# Altium PCB IDC_Tester_v1.PcbDoc (part 4 of 5)
Units mm, origin at the board's own origin, x right, y up, seen from the top; angles counter-clockwise.
Board outline 140 x 140 mm, 2 copper layers (Top Layer, Bottom Layer); 594 components, 528 nets, 1855 pads, 179 vias.
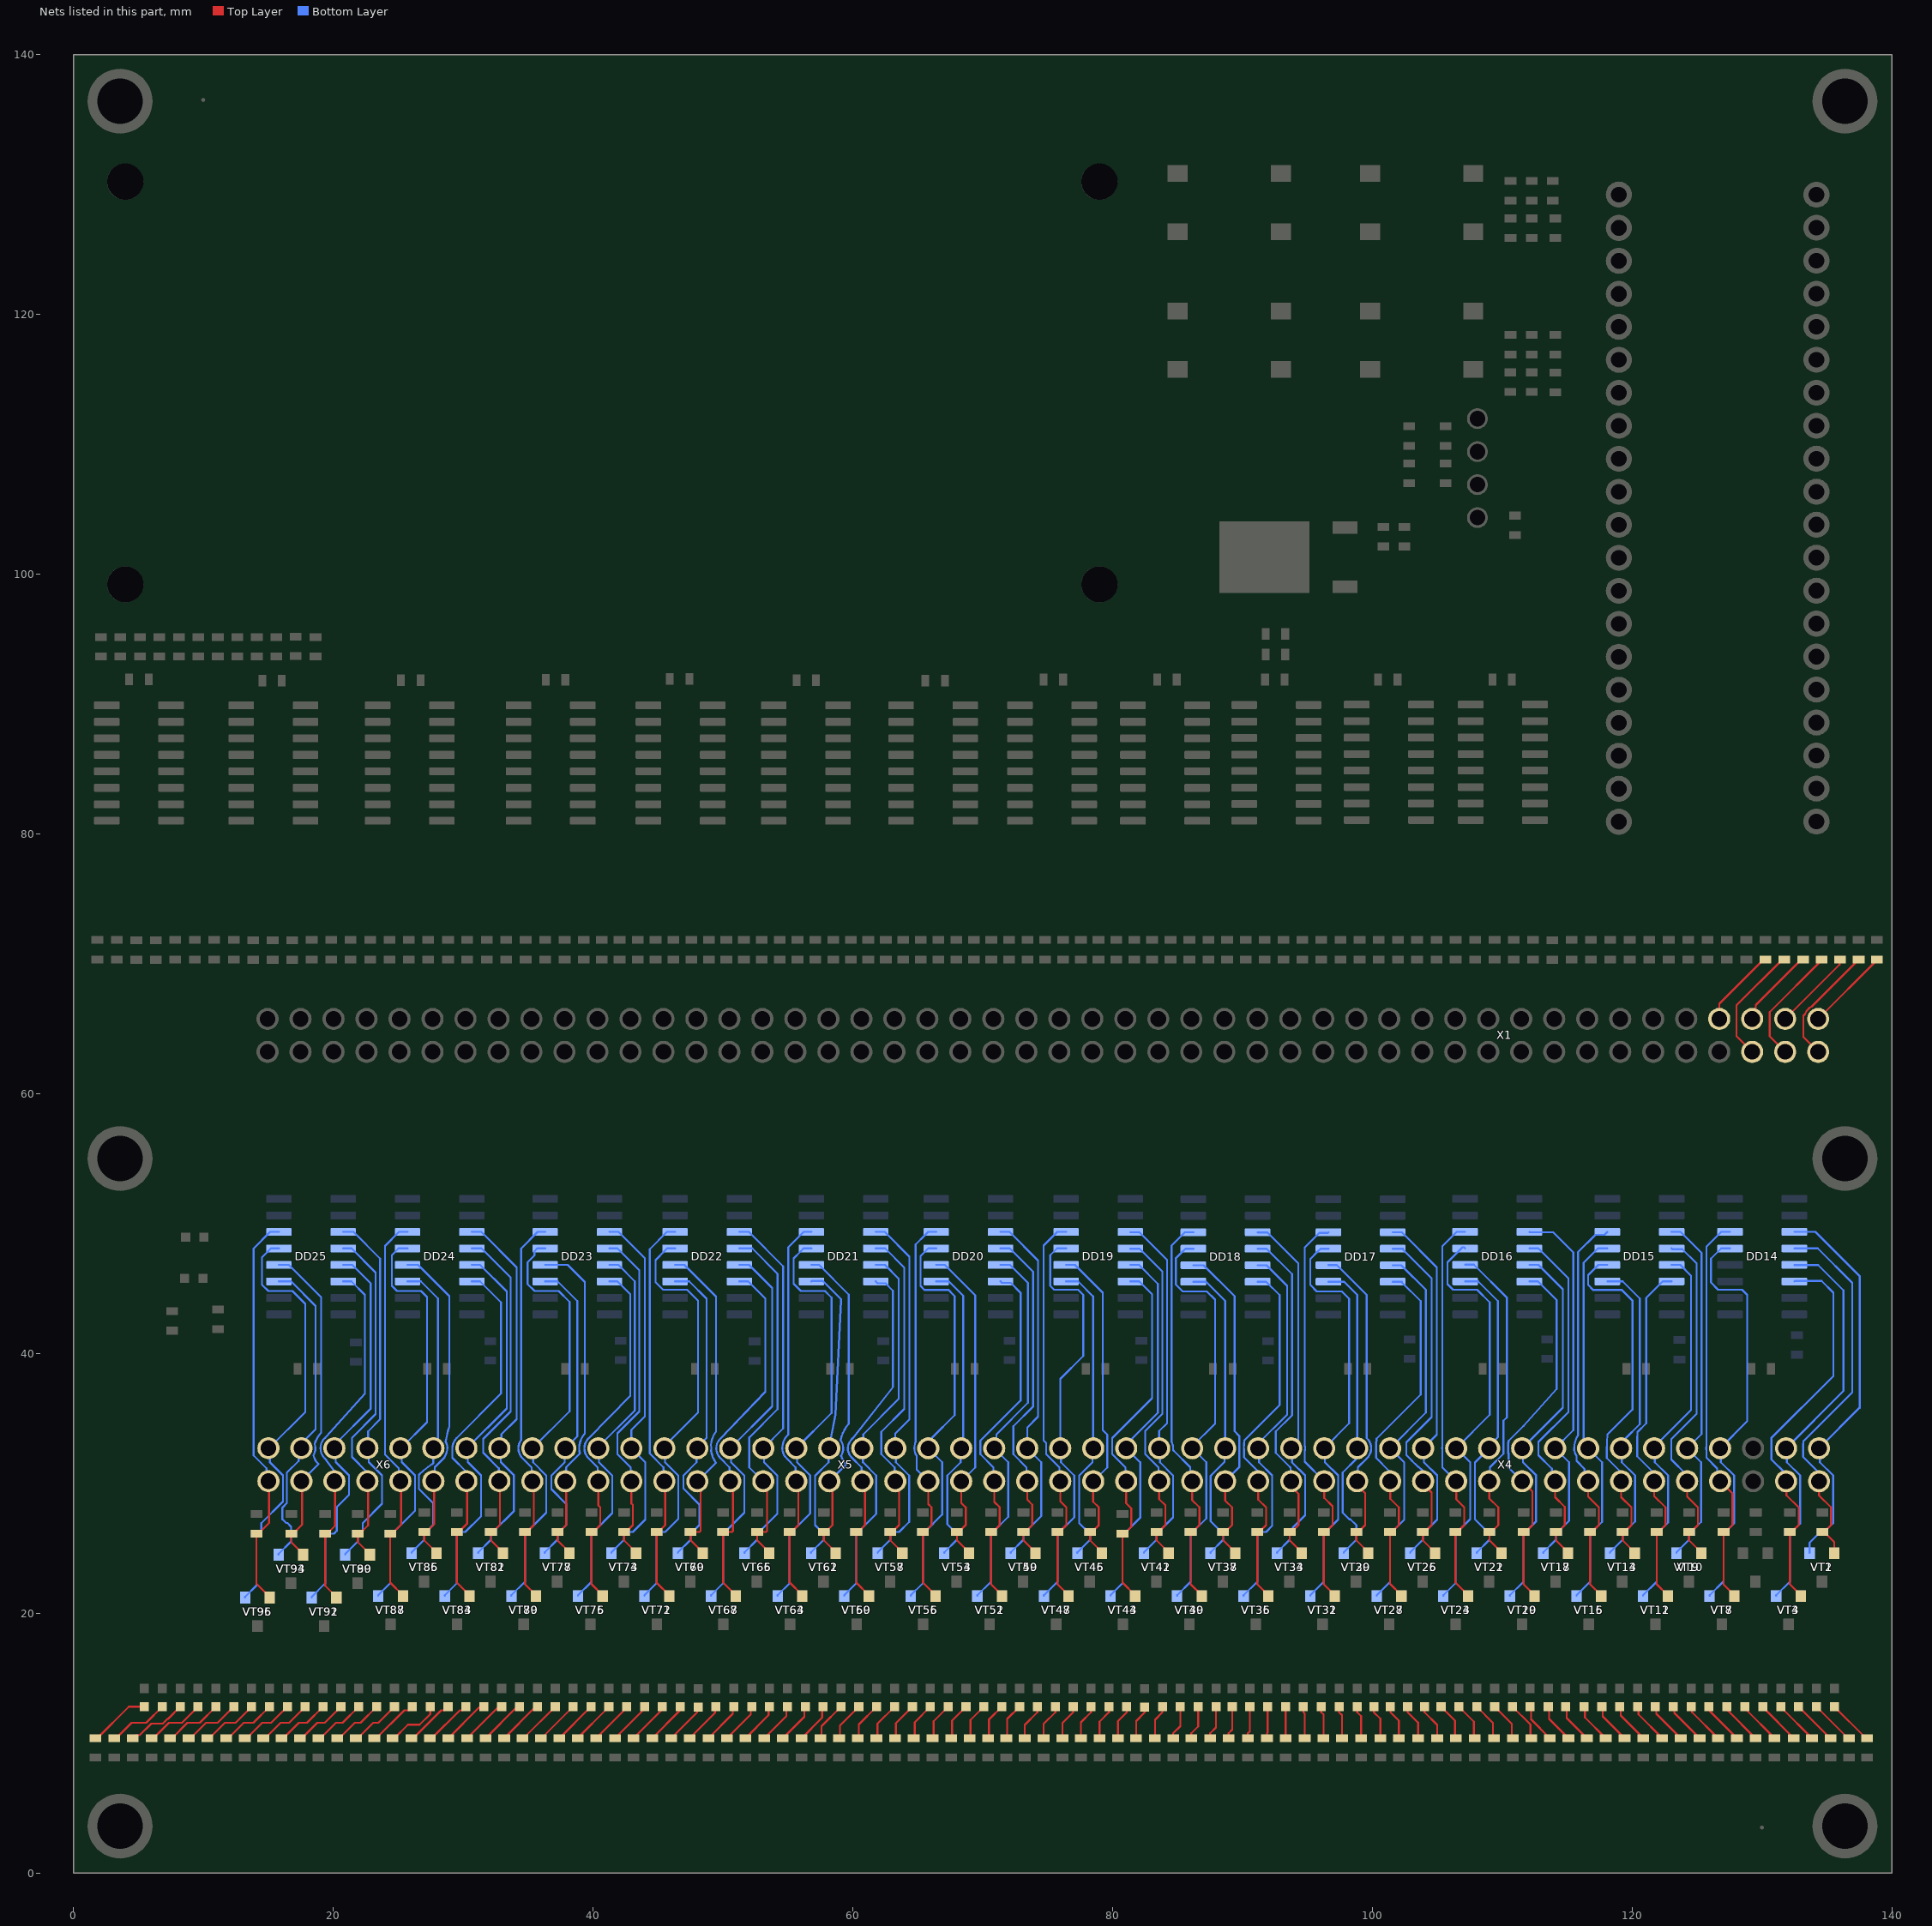
[diagram p3: the nets of this part, all layers, seen from the top]

## Via types
v1: diameter 0.6, hole 0.3, Top Layer to Bottom Layer, 179 vias

## Nets (pads, with @x,y where several pads share a name; then routed paths per layer and width w, separated by ;. In a path a pad name is that pad's centre, name@x,y a point inside that pad or via, vN(x,y) a via of type N, cw(c..) or ccw(c..) an arc to the next point about the centre after c; other vN are vias at no path point) (continued)
NetDD14_5: DD14.5 R14.1 VT7.1 X4.7 | length 32.2
  Bottom Layer w0.15: VT7.1@125.975,21.325 125.975,21.375 127.05,22.45 R14.1@127.05,26.25 127.2,26.25 127.86,26.91 127.86,30.6 126.84,31.62 126.84,32.64 126.785,32.695 128.875,34.785 128.875,44.504 128.474,44.905 126.626,44.905 126.075,45.456 126.075,47.29 126.865,48.08 DD14.5@127.55,48.08
NetDD14_6: DD14.6 R16.1 VT8.1 X4.8 | length 30.7
  Top Layer w0.15: X4.8@126.785,30.155 127.725,29.215 127.725,26.775 127.2,26.25 R16.1@127.05,26.25 127.05,22.2 127.875,21.375 VT8.1@127.875,21.325
  Bottom Layer w0.15: X4.8@126.785,30.155 126.558,30.382 126.558,31.142 125.725,31.975 125.725,32.494 cw(c126.781,32.695) 125.725,32.896 125.725,48.21 126.865,49.35 DD14.6@127.55,49.35
NetDD14_11: DD14.11 R2.1 VT1.1 X4.1 | length 30.4
  Bottom Layer w0.15: DD14.11@132.5,49.35 134.125,49.35 137.525,45.95 137.525,35.815 134.405,32.695 134.46,32.64 134.46,31.62 135.48,30.6 135.48,26.93 134.8,26.25 R2.1@134.65,26.25 134.5,26.25 133.675,25.425 VT1.1@133.675,24.625
NetDD14_12: DD14.12 R4.1 VT2.1 X4.2 | length 29.5
  Top Layer w0.15: X4.2@134.405,30.155 134.405,29.063 135.325,28.143 135.325,26.775 R4.1@134.8,26.25 ; R4.1@134.65,26.25 R4.1@134.8,26.25 ; VT2.1@135.575,24.625 135.575,25.475 R4.1@134.8,26.25
  Bottom Layer w0.15: DD14.12@132.5,48.08 134.295,48.08 136.95,45.425 136.95,37 133.238,33.288 133.199,33.249 ccw(c138.97,32.715) 133.175,32.625 133.175,32.025 133.219,31.981 134.35,30.85 134.35,30.21 X4.2@134.405,30.155
NetDD14_13: DD14.13 R6.1 VT3.1 X4.3 | length 31.2
  Bottom Layer w0.15: VT3.1@131.1,21.325 131.1,21.375 132.15,22.425 R6.1@132.15,26.25 132.3,26.25 132.94,26.89 132.94,30.6 131.92,31.62 131.92,32.64 131.865,32.695 136.275,37.105 136.275,44.85 134.325,46.8 132.51,46.8 DD14.13@132.5,46.81
NetDD14_14: DD14.14 R8.1 VT4.1 X4.4 | length 30.3
  Top Layer w0.15: X4.4@131.865,30.155 131.888,30.132 131.888,29.08 132.825,28.143 132.825,26.775 132.3,26.25 R8.1@132.15,26.25 132.15,22.225 133,21.375 VT4.1@133,21.325
  Bottom Layer w0.15: X4.4@131.865,30.155 131.81,30.21 131.81,30.765 130.725,31.85 130.725,33.475 135.5,38.25 135.5,44.675 134.6,45.575 132.535,45.575 DD14.14@132.5,45.54
NetDD15_3: DD15.3 R26.1 VT13.1 X4.13 | length 24.6
  Bottom Layer w0.15: DD15.3@118.1,45.54 119.285,45.54 120.6,44.225 120.6,34.55 119.462,33.412 119.462,32.992 119.165,32.695 119.22,32.64 119.22,31.62 120.24,30.6 120.24,27.065 119.425,26.25 R26.1@119.275,26.25 119.275,25.65 118.3,24.675 VT13.1@118.3,24.625
NetDD15_4: DD15.4 R28.1 VT14.1 X4.14 | length 28.2
  Top Layer w0.15: X4.14@119.165,30.155 119.165,28.928 119.95,28.143 119.95,26.775 119.425,26.25 R28.1@119.275,26.25 119.275,25.6 120.2,24.675 VT14.1@120.2,24.625
  Bottom Layer w0.15: DD15.4@118.1,46.81 117.415,46.81 116.625,46.02 116.625,45.275 117.025,44.875 119.225,44.875 120.03,44.07 120.03,35.68 118.108,33.758 ccw(c130.027,32.656) 118.057,32.577 118.057,31.943 119.11,30.89 119.11,30.21 X4.14@119.165,30.155
NetDD15_5: DD15.5 R30.1 VT15.1 X4.15 | length 29.4
  Bottom Layer w0.15: VT15.1@115.725,21.325 115.725,21.375 116.775,22.425 R30.1@116.775,26.25 116.925,26.25 117.7,27.025 117.7,31.62 116.625,32.695 116.275,33.045 116.275,46.975 117.38,48.08 DD15.5@118.1,48.08
NetDD15_6: DD15.6 R32.1 VT16.1 X4.16 | length 30.9
  Top Layer w0.15: X4.16@116.625,30.155 116.625,28.968 117.45,28.143 117.45,26.775 116.925,26.25 R32.1@116.775,26.25 116.775,22.225 117.625,21.375 VT16.1@117.625,21.325
  Bottom Layer w0.15: X4.16@116.625,30.155 116.348,30.432 116.348,31.102 115.725,31.725 115.725,32.101 cw(c116.621,32.695) 115.546,32.695 cw(c117.372,32.695) 115.85,33.704 115.85,47.8 117.175,49.125 117.875,49.125 DD15.6@118.1,49.35
NetDD15_11: DD15.11 R18.1 VT9.1 X4.9 | length 27.9
  Bottom Layer w0.15: DD15.11@123.05,49.35 123.735,49.35 125.35,47.735 125.35,33.8 124.245,32.695 125.32,31.62 125.32,27.02 124.55,26.25 R18.1@124.4,26.25 124.4,25.65 123.425,24.675 VT9.1@123.425,24.625
NetDD15_12: DD15.12 R20.1 VT10.1 X4.10 | length 27.1
  Top Layer w0.15: X4.10@124.245,30.155 124.245,28.973 125.075,28.143 125.075,26.775 124.55,26.25 R20.1@124.4,26.25 124.4,25.6 125.325,24.675 VT10.1@125.325,24.625
  Bottom Layer w0.15: DD15.12@123.05,48.08 123.105,48.025 123.875,48.025 124.975,46.925 124.975,35.35 123.025,33.4 123.025,31.825 124.19,30.66 124.19,30.21 X4.10@124.245,30.155
NetDD15_13: DD15.13 R22.1 VT11.1 X4.11 | length 29
  Bottom Layer w0.15: VT11.1@120.85,21.325 120.85,21.375 121.9,22.425 R22.1@121.9,26.25 122.05,26.25 122.78,26.98 122.78,30.6 121.76,31.62 121.76,32.64 121.705,32.695 121.705,32.804 124.55,35.649 124.55,45.975 123.715,46.81 DD15.13@123.05,46.81
NetDD15_14: DD15.14 R24.1 VT12.1 X4.12 | length 27.3
  Top Layer w0.15: X4.12@121.705,30.155 121.705,29.013 122.575,28.143 122.575,26.775 122.05,26.25 R24.1@121.9,26.25 121.9,22.225 122.75,21.375 VT12.1@122.75,21.325
  Bottom Layer w0.15: X4.12@121.705,30.155 121.65,30.21 121.65,30.825 120.4,32.075 120.4,32.69 ccw(c120.25,32.689) 120.4,32.703 cw(c121.471,32.788) 120.396,32.796 cw(c175.651,32.503) 120.414,33.94 121.1,34.626 121.1,44.275 122.365,45.54 DD15.14@123.05,45.54
NetDD16_3: DD16.3 R42.1 VT21.1 X4.21 | length 24.2
  Bottom Layer w0.15: DD16.3@107.15,45.54 108.16,45.54 109.675,44.025 109.675,33.545 109.005,32.875 109.005,32.695 107.9,31.59 107.9,27.225 108.875,26.25 R42.1@109.025,26.25 109.025,25.65 108.05,24.675 VT21.1@108.05,24.625
NetDD16_4: DD16.4 R44.1 VT22.1 X4.22 | length 25.5
  Top Layer w0.15: X4.22@109.005,30.155 109.005,28.838 109.7,28.143 109.7,26.775 109.175,26.25 R44.1@109.025,26.25 109.025,25.6 109.95,24.675 VT22.1@109.95,24.625
  Bottom Layer w0.15: DD16.4@107.15,46.81 107.165,46.825 107.825,46.825 110.375,44.275 110.375,35.084 110.1,34.809 110.1,32.27 109.06,31.23 109.06,30.21 X4.22@109.005,30.155
NetDD16_5: DD16.5 R46.1 VT23.1 X4.23 | length 32.4
  Bottom Layer w0.15: VT23.1@105.475,21.325 105.475,21.375 106.4,22.3 R46.1@106.4,26.25 106.55,26.25 107.54,27.24 107.54,31.62 106.465,32.695 109.05,35.28 109.05,43.929 108.074,44.905 106.226,44.905 105.8,45.331 105.8,47.019 106.943,48.163 107.067,48.163 DD16.5@107.15,48.08
NetDD16_6: DD16.6 R48.1 VT24.1 X4.24 | length 30.6
  Top Layer w0.15: X4.24@106.465,30.155 106.465,28.753 107.075,28.143 107.075,26.775 106.55,26.25 R48.1@106.4,26.25 106.4,22.35 107.375,21.375 VT24.1@107.375,21.325
  Bottom Layer w0.15: X4.24@106.465,30.155 105.4,31.22 105.4,32.522 cw(c106.461,32.695) 105.4,32.868 105.4,48.25 106.5,49.35 DD16.6@107.15,49.35
NetDD16_11: DD16.11 R34.1 VT17.1 X4.17 | length 29.1
  Bottom Layer w0.15: DD16.11@112.1,49.35 112.125,49.325 113.925,49.325 115.475,47.775 115.475,34.085 114.085,32.695 115.16,31.62 115.16,27.11 114.3,26.25 R34.1@114.15,26.25 114.15,25.65 113.175,24.675 VT17.1@113.175,24.625
NetDD16_12: DD16.12 R36.1 VT18.1 X4.18 | length 27.6
  Top Layer w0.15: X4.18@114.085,30.155 114.085,28.916 114.825,28.176 114.825,26.775 114.3,26.25 R36.1@114.15,26.25 114.15,25.6 115.075,24.675 VT18.1@115.075,24.625
  Bottom Layer w0.15: DD16.12@112.1,48.08 112.795,48.08 115.1,45.775 115.1,35.475 112.8,33.175 112.8,32.151 113.828,31.122 113.828,30.412 X4.18@114.085,30.155
NetDD16_13: DD16.13 R38.1 VT19.1 X4.19 | length 29.6
  Bottom Layer w0.15: VT19.1@110.6,21.325 110.6,21.375 111.65,22.425 R38.1@111.65,26.25 111.8,26.25 112.62,27.07 112.62,30.6 111.6,31.62 111.6,32.64 111.545,32.695 114.675,35.825 114.675,44.925 112.79,46.81 DD16.13@112.1,46.81
NetDD16_14: DD16.14 R40.1 VT20.1 X4.20 | length 28.5
  Top Layer w0.15: X4.20@111.545,30.155 112.325,29.375 112.325,26.775 111.8,26.25 R40.1@111.65,26.25 111.65,22.225 112.5,21.375 VT20.1@112.5,21.325
  Bottom Layer w0.15: X4.20@111.545,30.155 111.49,30.21 110.5,31.2 110.5,32.303 110.466,32.303 110.466,33.14 110.5,33.174 110.5,33.271 111.651,34.422 114.2,37.25 114.2,44.1 112.76,45.54 DD16.14@112.1,45.54
NetDD17_3: DD17.3 R58.1 VT29.1 X4.29 | length 23.9
  Bottom Layer w0.15: DD17.3@96.629,45.517 97.839,45.517 98.845,44.511 98.845,32.695 98.79,32.64 98.79,31.89 97.725,30.825 97.725,27.732 98.232,27.225 98.325,27.225 98.775,26.775 R58.1@98.775,26.25 98.775,25.65 97.8,24.675 VT29.1@97.8,24.625
NetDD17_4: DD17.4 R60.1 VT30.1 X4.30 | length 25.3
  Top Layer w0.15: X4.30@98.845,30.155 98.845,29.845 99.45,29.24 99.45,26.775 98.925,26.25 R60.1@98.775,26.25 98.775,25.6 99.7,24.675 VT30.1@99.7,24.625
  Bottom Layer w0.15: DD17.4@96.629,46.787 96.642,46.8 97.275,46.8 99.575,44.5 99.575,33.485 99.592,33.468 cw(c98.845,32.695) 99.585,31.915 ccw(c99.689,31.807) 99.575,31.905 99.565,31.894 98.9,31.23 98.9,30.21 X4.30@98.845,30.155
NetDD17_5: DD17.5 R62.1 VT31.1 X4.31 | length 32.3
  Bottom Layer w0.15: VT31.1@95.225,21.325 95.225,21.375 96.275,22.425 R62.1@96.275,26.25 96.425,26.25 97.38,27.205 97.38,30.6 96.36,31.62 96.36,32.64 96.305,32.695 98.225,34.615 98.225,44.21 97.663,44.772 95.728,44.772 95.225,45.275 95.225,46.942 95.225,47.263 95.794,47.832 96.019,48.057 DD17.5@96.629,48.057
NetDD17_6: DD17.6 R64.1 VT32.1 X4.32 | length 30.8
  Top Layer w0.15: X4.32@96.305,30.155 96.305,28.869 96.95,28.224 96.95,26.775 96.425,26.25 R64.1@96.275,26.25 96.275,22.225 97.125,21.375 VT32.1@97.125,21.325
  Bottom Layer w0.15: X4.32@96.305,30.155 94.8,31.66 94.8,32.419 ccw(c93.761,32.695) 94.8,32.971 94.8,48.15 95.932,49.282 96.584,49.282 DD17.6@96.629,49.327
NetDD17_11: DD17.11 R50.1 VT25.1 X4.25 | length 28.3
  Bottom Layer w0.15: DD17.11@101.579,49.327 102.273,49.327 104.975,46.625 104.975,33.745 103.925,32.695 103.98,32.64 103.98,31.62 105,30.6 105,27.2 104.05,26.25 R50.1@103.9,26.25 103.9,25.65 102.925,24.675 VT25.1@102.925,24.625
NetDD17_12: DD17.12 R52.1 VT26.1 X4.26 | length 27.5
  Top Layer w0.15: X4.26@103.925,30.155 103.925,29.935 104.575,29.285 104.575,26.775 104.05,26.25 R52.1@103.9,26.25 103.9,25.6 104.825,24.675 VT26.1@104.825,24.625
  Bottom Layer w0.15: DD17.12@101.579,48.057 101.586,48.05 102.375,48.05 102.375,47.975 104.575,45.775 104.575,35.1 102.625,33.15 102.625,32.175 103.025,31.775 ccw(c103.838,32.478) 103.08,31.716 ccw(c113.186,41.871) 103.818,31.031 cw(c103.72,30.918) 103.87,30.918 103.87,30.21 X4.26@103.925,30.155
NetDD17_13: DD17.13 R54.1 VT27.1 X4.27 | length 29.4
  Bottom Layer w0.15: VT27.1@100.35,21.325 100.35,21.375 101.375,22.4 R54.1@101.375,26.25 101.525,26.25 102.46,27.185 102.46,31.62 101.385,32.695 104.125,35.435 104.125,44.9 102.238,46.787 DD17.13@101.579,46.787
NetDD17_14: DD17.14 R56.1 VT28.1 X4.28 | length 28.4
  Top Layer w0.15: X4.28@101.385,30.155 101.385,28.808 102.05,28.143 102.05,26.775 101.525,26.25 R56.1@101.375,26.25 101.375,22.25 102.25,21.375 VT28.1@102.25,21.325
  Bottom Layer w0.15: X4.28@101.385,30.155 101.33,30.21 101.33,30.92 100.292,31.958 100.292,32.585 cw(c108.157,32.701) 100.325,33.425 103.725,36.825 103.725,44.025 102.3,45.45 102.3,45.517 DD17.14@101.579,45.517
NetDD18_3: DD18.3 R74.1 VT37.1 X4.37 | length 23.8
  Bottom Layer w0.15: DD18.3@86.229,45.517 87.208,45.517 88.681,44.044 X4.37@88.681,32.695 ; VT37.1@87.55,24.625 87.55,24.675 88.525,25.65 R74.1@88.525,26.25 88.375,26.25 87.55,27.075 87.55,30.485 87.55,30.54 cw(c93.884,25.065) 87.963,30.985 88.63,31.651 88.63,32.64 X4.37@88.685,32.695
NetDD18_4: DD18.4 R76.1 VT38.1 X4.38 | length 25.5
  Top Layer w0.15: X4.38@88.685,30.155 88.685,28.658 89.2,28.143 89.2,26.775 88.675,26.25 R76.1@88.525,26.25 88.525,25.6 89.45,24.675 VT38.1@89.45,24.625
  Bottom Layer w0.15: DD18.4@86.229,46.787 87.013,46.787 89.4,44.4 89.4,34.01 89.76,33.65 89.76,31.23 X4.38@88.685,30.155
NetDD18_5: DD18.5 R78.1 VT39.1 X4.39 | length 32.2
  Bottom Layer w0.15: VT39.1@84.975,21.325 84.975,21.375 86.025,22.425 R78.1@86.025,26.25 86.175,26.25 87.22,27.295 87.22,31.62 86.145,32.695 86.145,32.835 87.9,34.59 87.9,44.135 87.263,44.772 85.415,44.772 84.875,45.312 84.875,47.313 85.394,47.832 85.619,48.057 DD18.5@86.229,48.057
NetDD18_6: DD18.6 R80.1 VT40.1 X4.40 | length 30.7
  Top Layer w0.15: X4.40@86.145,30.155 86.145,28.698 86.7,28.143 86.7,26.775 86.175,26.25 R80.1@86.025,26.25 86.025,22.225 86.875,21.375 VT40.1@86.875,21.325
  Bottom Layer w0.15: X4.40@86.145,30.155 85.995,30.305 85.995,31.23 84.717,32.508 84.673,32.552 ccw(c84.259,32.605) 84.674,32.646 ccw(c83.6,32.69) 84.55,33.193 84.55,48.3 85.577,49.327 DD18.6@86.229,49.327
NetDD18_11: DD18.11 R66.1 VT33.1 X4.33 | length 28
  Bottom Layer w0.15: DD18.11@91.179,49.327 91.206,49.3 91.925,49.3 94.3,46.925 94.3,33.234 X4.33@93.761,32.695 ; VT33.1@92.675,24.625 92.675,24.675 93.65,25.65 R66.1@93.65,26.25 93.875,26.475 93.875,26.575 94.84,27.54 94.84,30.6 93.82,31.62 93.82,32.64 X4.33@93.765,32.695
NetDD18_12: DD18.12 R68.1 VT34.1 X4.34 | length 26.9
  Top Layer w0.15: X4.34@93.765,30.155 93.765,29.755 94.325,29.195 94.325,26.775 93.8,26.25 R68.1@93.65,26.25 93.65,25.6 94.575,24.675 VT34.1@94.575,24.625
  Bottom Layer w0.15: DD18.12@91.179,48.057 91.868,48.057 93.825,46.1 93.825,35.235 92.575,33.985 92.575,32.336 93.665,31.245 ; 93.666,31.245 93.71,31.201 93.71,30.21 X4.34@93.765,30.155
NetDD18_13: DD18.13 R70.1 VT35.1 X4.35 | length 29.5
  Bottom Layer w0.15: VT35.1@90.1,21.325 90.1,21.375 91.15,22.425 R70.1@91.15,26.25 91.825,26.25 92.3,26.725 92.3,30.6 91.28,31.62 91.28,32.64 91.225,32.695 91.225,33.059 93.45,35.284 93.45,45.2 91.863,46.787 DD18.13@91.179,46.787
NetDD18_14: DD18.14 R72.1 VT36.1 X4.36 | length 27.8
  Top Layer w0.15: X4.36@91.225,30.155 91.225,28.743 91.825,28.143 91.825,26.775 91.3,26.25 R72.1@91.15,26.25 91.15,22.225 92,21.375 VT36.1@92,21.325
  Bottom Layer w0.15: DD18.14@91.179,45.517 91.833,45.517 92.865,44.485 92.865,36.015 90.189,33.339 90.15,33.3 ccw(c96.804,32.685) 90.122,32.721 ccw(c91.197,32.717) 90.125,32.631 cw(c89.976,32.618) 90.126,32.619 90.126,31.999 91.17,30.955 91.17,30.21 X4.36@91.225,30.155
NetDD19_3: DD19.3 R90.1 VT45.1 X5.5 | length 23.6
  Bottom Layer w0.15: DD19.3@76.429,45.54 77.36,45.54 78.52,44.38 X5.5@78.52,32.69 78.465,32.635 78.465,31.615 77.445,30.595 77.445,26.93 78.125,26.25 R90.1@78.275,26.25 78.275,25.65 77.3,24.675 VT45.1@77.3,24.625
NetDD19_4: DD19.4 R92.1 VT46.1 X5.6 | length 25.3
  Top Layer w0.15: X5.6@78.52,30.15 78.52,28.573 78.95,28.143 78.95,26.775 78.425,26.25 R92.1@78.275,26.25 78.275,25.6 79.2,24.675 VT46.1@79.2,24.625
  Bottom Layer w0.15: DD19.4@76.429,46.81 77.115,46.81 79.25,44.675 79.25,34.095 79.595,33.75 79.595,31.225 X5.6@78.52,30.15
NetDD19_5: DD19.5 R94.1 VT47.1 X5.7 | length 32
  Bottom Layer w0.15: VT47.1@74.725,21.325 74.725,21.375 75.775,22.425 R94.1@75.775,26.25 75.925,26.25 77.055,27.38 77.055,30.595 76.035,31.615 76.035,32.635 X5.7@75.98,32.69 75.98,38.035 77.75,39.805 77.75,44.508 77.353,44.905 75.505,44.905 75.219,45.191 75.219,47.555 75.744,48.08 DD19.5@76.429,48.08
NetDD19_6: DD19.6 R96.1 VT48.1 X5.8 | length 30.6
  Top Layer w0.15: X5.8@75.98,30.15 75.98,28.613 76.45,28.143 76.45,26.775 75.925,26.25 R96.1@75.775,26.25 75.775,22.225 76.625,21.375 VT48.1@76.625,21.325
  Bottom Layer w0.15: X5.8@75.98,30.15 75.925,30.205 75.925,31.225 74.904,32.246 74.904,33.096 74.7,33.3 74.7,48.3 75.75,49.35 DD19.6@76.429,49.35
NetDD19_11: DD19.11 R82.1 VT41.1 X5.1 | length 28
  Bottom Layer w0.15: DD19.11@81.379,49.327 82.073,49.327 84.2,47.2 84.2,34.625 83.6,34.025 X5.1@83.6,32.69 83.655,32.635 83.655,31.615 84.675,30.595 84.675,27.375 83.55,26.25 R82.1@83.4,26.25 83.4,25.65 82.425,24.675 VT41.1@82.425,24.625
NetDD19_12: DD19.12 R84.1 VT42.1 X5.2 | length 26.8
  Top Layer w0.15: X5.2@83.6,30.15 83.6,28.781 84.075,28.306 84.075,26.775 83.55,26.25 R84.1@83.4,26.25 83.4,25.6 84.325,24.675 VT42.1@84.325,24.625
  Bottom Layer w0.15: DD19.12@81.379,48.057 82.093,48.057 83.85,46.3 83.85,35.35 82.525,34.025 82.525,32.245 83.545,31.225 83.545,30.205 X5.2@83.6,30.15
NetDD19_13: DD19.13 R86.1 VT43.1 X5.3 | length 29.2
  Bottom Layer w0.15: VT43.1@79.85,21.325 79.85,21.375 80.775,22.3 R86.1@80.775,26.125 80.925,26.125 82.135,27.335 82.135,31.615 X5.3@81.06,32.69 81.06,32.984 83.5,35.424 83.5,45.35 82.04,46.81 DD19.13@81.379,46.81
NetDD19_14: DD19.14 R88.1 VT44.1 X5.4 | length 28
  Top Layer w0.15: X5.4@81.06,30.15 81.06,28.46 81.45,28.07 81.45,26.65 80.925,26.125 R88.1@80.775,26.125 80.775,22.35 81.75,21.375 VT44.1@81.75,21.325
  Bottom Layer w0.15: X5.4@81.06,30.15 81.005,30.205 81.005,31.225 79.985,32.245 79.985,33.485 83.05,36.55 83.05,44.55 82.06,45.54 DD19.14@81.379,45.54
NetDD20_3: DD20.3 R106.1 VT53.1 X5.13 | length 23.7
  Bottom Layer w0.15: DD20.3@66.429,45.54 67.41,45.54 68.513,44.437 68.513,32.843 X5.13@68.36,32.69 68.305,32.635 68.305,31.615 67.285,30.595 67.285,26.84 67.875,26.25 R106.1@68.025,26.25 68.025,25.65 67.05,24.675 VT53.1@67.05,24.625
NetDD20_4: DD20.4 R108.1 VT54.1 X5.14 | length 25.2
  Top Layer w0.15: X5.14@68.36,30.15 68.36,28.483 68.7,28.143 68.7,26.775 68.175,26.25 R108.1@68.025,26.25 68.025,25.6 68.95,24.675 VT54.1@68.95,24.625
  Bottom Layer w0.15: DD20.4@66.429,46.81 67.09,46.81 69.435,44.465 69.435,31.225 X5.14@68.36,30.15
NetDD20_5: DD20.5 R110.1 VT55.1 X5.15 | length 32.2
  Bottom Layer w0.15: VT55.1@64.475,21.325 64.475,21.375 65.4,22.3 R110.1@65.4,26.25 65.55,26.25 66.895,27.595 66.895,31.615 X5.15@65.82,32.69 66.117,32.987 66.117,33.517 67.85,35.25 67.85,44.408 67.639,44.619 67.463,44.795 67.383,44.875 67.275,44.875 65.535,44.875 65.219,45.191 65.219,45.889 65.225,45.895 65.225,46.455 65.219,46.461 65.219,47.159 65.225,47.165 65.225,47.486 65.594,47.855 65.819,48.08 DD20.5@66.429,48.08
NetDD20_6: DD20.6 R112.1 VT56.1 X5.16 | length 30.3
  Top Layer w0.15: X5.16@65.82,30.15 65.82,28.398 66.075,28.143 66.075,26.775 65.55,26.25 R112.1@65.4,26.25 65.4,22.35 66.375,21.375 VT56.1@66.375,21.325
  Bottom Layer w0.15: X5.16@65.82,30.15 64.925,31.045 64.925,32.095 cw(c65.82,32.69) 64.745,32.69 cw(c66.156,32.69) 64.85,33.224 64.85,48.381 65.594,49.125 65.819,49.35 DD20.6@66.429,49.35
NetDD20_11: DD20.11 R98.1 VT49.1 X5.9 | length 28.2
  Bottom Layer w0.15: DD20.11@71.379,49.35 72.075,49.35 74.275,47.15 74.275,35.125 73.44,34.29 X5.9@73.44,32.69 74.515,31.615 74.515,27.465 73.3,26.25 R98.1@73.15,26.25 73.15,25.65 72.175,24.675 VT49.1@72.175,24.625
NetDD20_12: DD20.12 R100.1 VT50.1 X5.10 | length 26.9
  Top Layer w0.15: X5.10@73.44,30.15 73.44,28.736 73.825,28.351 73.825,26.775 73.3,26.25 R100.1@73.15,26.25 73.15,25.6 74.075,24.675 VT50.1@74.075,24.625
  Bottom Layer w0.15: DD20.12@71.379,48.08 72.095,48.08 73.9,46.275 73.9,35.925 72.365,34.39 72.365,32.245 73.385,31.225 73.385,30.205 X5.10@73.44,30.15
NetDD20_13: DD20.13 R102.1 VT51.1 X5.11 | length 29.4
  Bottom Layer w0.15: VT51.1@69.6,21.325 69.6,21.375 70.65,22.425 R102.1@70.65,26.25 70.8,26.25 71.975,27.425 71.975,31.615 X5.11@70.9,32.69 71.065,32.855 71.065,33.765 73.5,36.2 73.5,45.425 72.115,46.81 DD20.13@71.379,46.81
NetDD20_14: DD20.14 R104.1 VT52.1 X5.12 | length 27.9
  Top Layer w0.15: X5.12@70.9,30.15 70.9,28.568 71.325,28.143 71.325,26.775 70.8,26.25 R104.1@70.65,26.25 70.65,22.225 71.5,21.375 VT52.1@71.5,21.325
  Bottom Layer w0.15: X5.12@70.9,30.15 70.845,30.205 70.845,31.225 69.825,32.245 69.825,33.275 72.925,36.375 72.925,44.675 72.177,45.423 71.496,45.423 DD20.14@71.379,45.54
NetDD21_3: DD21.3 R122.1 VT61.1 X5.21 | length 23.7
  Bottom Layer w0.15: VT61.1@56.8,24.625 56.8,24.675 57.775,25.65 R122.1@57.775,26.25 57.625,26.25 57.1,26.775 57.1,30.57 58.145,31.615 58.145,32.635 X5.21@58.2,32.69 58.2,32.748 58.2,32.81 58.675,35.281 59.1,44.051 59.1,44.175 57.7,45.575 56.864,45.575 DD21.3@56.829,45.54
NetDD21_4: DD21.4 R124.1 VT62.1 X5.22 | length 25.5
  Top Layer w0.15: X5.22@58.2,30.15 58.45,29.9 58.45,26.775 57.925,26.25 R124.1@57.775,26.25 57.775,25.6 58.7,24.675 VT62.1@58.7,24.625
  Bottom Layer w0.15: DD21.4@56.829,46.81 57.415,46.81 59.7,44.525 59.7,34.592 ccw(c61.848,32.734) 59.07,33.322 cw(c58.2,32.69) 59.108,32.114 ccw(c60.986,32.734) 59.49,31.44 X5.22@58.2,30.15
NetDD21_5: DD21.5 R126.1 VT63.1 X5.23 | length 32.7
  Bottom Layer w0.15: VT63.1@54.225,21.325 54.225,21.375 55.15,22.3 R126.1@55.15,26.25 55.3,26.25 56.735,27.685 56.735,30.595 55.715,31.615 55.715,32.635 X5.23@55.66,32.69 58.375,35.405 58.375,44.283 58.039,44.619 57.863,44.795 56.015,44.795 55.45,45.36 55.45,47.311 55.994,47.855 56.219,48.08 DD21.5@56.829,48.08
NetDD21_6: DD21.6 R128.1 VT64.1 X5.24 | length 30.5
  Top Layer w0.15: X5.24@55.66,30.15 55.825,29.985 55.825,26.775 55.3,26.25 R128.1@55.15,26.25 55.15,22.35 56.125,21.375 VT64.1@56.125,21.325
  Bottom Layer w0.15: X5.24@55.66,30.15 55.605,30.205 55.605,31.225 54.925,31.905 cw(c55.66,32.69) 54.585,32.69 cw(c56.055,32.69) 55.05,33.763 55.05,48.175 56.225,49.35 DD21.6@56.829,49.35
NetDD21_11: DD21.11 R114.1 VT57.1 X5.17 | length 28.5
  Bottom Layer w0.15: DD21.11@61.779,49.35 62.475,49.35 64.375,47.45 64.375,34.92 63.28,33.825 X5.17@63.28,32.69 63.335,32.635 63.335,31.615 64.355,30.595 64.355,27.03 63.575,26.25 R114.1@62.9,26.25 62.9,25.65 61.925,24.675 VT57.1@61.925,24.625
NetDD21_12: DD21.12 R116.1 VT58.1 X5.18 | length 26.8
  Top Layer w0.15: X5.18@63.28,30.15 63.575,29.855 63.575,26.775 63.05,26.25 R116.1@62.9,26.25 62.9,25.6 63.825,24.675 VT58.1@63.825,24.625
  Bottom Layer w0.15: DD21.12@61.779,48.08 62.495,48.08 63.975,46.6 63.975,35.72 62.205,33.95 62.205,32.245 63.225,31.225 63.225,30.205 X5.18@63.28,30.15
NetDD21_13: DD21.13 R118.1 VT59.1 X5.19 | length 29.4
  Bottom Layer w0.15: VT59.1@59.35,21.325 59.35,21.375 60.275,22.3 R118.1@60.275,26.25 60.425,26.25 61.815,27.64 61.815,30.595 60.795,31.615 60.795,32.635 X5.19@60.74,32.69 60.82,32.77 60.82,33.765 63.55,36.495 63.55,45.75 62.49,46.81 DD21.13@61.779,46.81
NetDD21_14: DD21.14 R120.1 VT60.1 X5.20 | length 27.6
  Top Layer w0.15: X5.20@60.74,30.15 60.95,29.94 60.95,26.775 60.425,26.25 R120.1@60.275,26.25 60.275,22.35 61.25,21.375 VT60.1@61.25,21.325
  Bottom Layer w0.15: X5.20@60.74,30.15 60.685,30.205 60.685,31.225 59.916,31.994 cw(c60.603,32.681) 59.861,33.308 cw(c60.74,32.69) 60,33.47 63.1,37.4 63.1,44.825 62.534,45.391 61.928,45.391 DD21.14@61.779,45.54
NetDD22_3: DD22.3 R138.1 VT69.1 X5.29 | length 24.6
  Bottom Layer w0.15: DD22.3@46.329,45.54 47.41,45.54 48.75,44.2 48.75,33.5 48.04,32.79 X5.29@48.04,32.69 47.985,32.635 47.985,31.615 46.965,30.595 46.965,29.594 48.2,28.359 48.2,26.775 47.675,26.25 R138.1@47.525,26.25 47.525,25.65 46.55,24.675 VT69.1@46.55,24.625
NetDD22_4: DD22.4 R140.1 VT70.1 X5.30 | length 25.9
  Top Layer w0.15: X5.30@48.04,30.15 48.288,29.902 48.288,26.338 48.2,26.25 R140.1@47.525,26.25 47.525,25.6 48.45,24.675 VT70.1@48.45,24.625
  Bottom Layer w0.15: DD22.4@46.329,46.81 47.04,46.81 49.475,44.375 49.475,33.974 ccw(c51.088,32.779) 49.087,32.934 cw(c48.04,32.69) 49.099,32.507 ccw(c51.088,32.779) 49.475,31.585 X5.30@48.04,30.15
NetDD22_5: DD22.5 R142.1 VT71.1 X5.31 | length 33.2
  Bottom Layer w0.15: VT71.1@43.975,21.325 43.975,21.375 44.9,22.3 R142.1@44.9,26.25 45.575,26.25 46.575,27.25 46.575,30.595 45.555,31.615 45.555,32.635 X5.31@45.5,32.69 45.5,32.85 48.1,35.45 48.1,44.058 47.253,44.905 45.405,44.905 44.825,45.485 44.825,47.186 45.494,47.855 45.719,48.08 DD22.5@46.329,48.08
NetDD22_6: DD22.6 R144.1 VT72.1 X5.32 | length 30.5
  Top Layer w0.15: X5.32@45.5,30.15 45.575,30.075 45.575,26.775 45.05,26.25 R144.1@44.9,26.25 44.9,22.35 45.875,21.375 VT72.1@45.875,21.325
  Bottom Layer w0.15: X5.32@45.5,30.15 45.445,30.205 45.445,31.225 44.375,32.295 44.375,48.025 45.7,49.35 DD22.6@46.329,49.35
NetDD22_11: DD22.11 R130.1 VT65.1 X5.25 | length 28.8
  Bottom Layer w0.15: DD22.11@51.279,49.35 52,49.35 54.65,46.7 54.65,34.22 X5.25@53.12,32.69 53.175,32.635 53.175,31.615 54.195,30.595 54.195,27.645 52.8,26.25 R130.1@52.65,26.25 52.65,25.65 51.675,24.675 VT65.1@51.675,24.625
NetDD22_12: DD22.12 R132.1 VT66.1 X5.26 | length 27.8
  Top Layer w0.15: X5.26@53.12,30.15 53.413,29.857 53.413,26.338 53.325,26.25 R132.1@52.65,26.25 52.65,25.6 53.575,24.675 VT66.1@53.575,24.625
  Bottom Layer w0.15: DD22.12@51.279,48.08 52.27,48.08 54.225,46.125 54.225,35.7 52.045,33.52 52.045,31.225 X5.26@53.12,30.15
NetDD22_13: DD22.13 R134.1 VT67.1 X5.27 | length 29.9
  Bottom Layer w0.15: VT67.1@49.1,21.325 49.1,21.375 50.025,22.3 R134.1@50.025,26.25 50.175,26.25 51.655,27.73 51.655,30.595 50.635,31.615 50.635,32.635 X5.27@50.58,32.69 50.58,32.705 53.8,35.925 53.8,45.025 52.015,46.81 DD22.13@51.279,46.81
NetDD22_14: DD22.14 R136.1 VT68.1 X5.28 | length 28.5
  Top Layer w0.15: X5.28@50.58,30.15 50.788,29.942 50.788,26.338 50.7,26.25 R136.1@50.025,26.25 50.025,22.35 51,21.375 VT68.1@51,21.325
  Bottom Layer w0.15: X5.28@50.58,30.15 50.525,30.205 50.525,31.225 49.82,31.93 cw(c50.58,32.69) 49.804,33.434 53.275,37.05 53.275,44.225 51.96,45.54 DD22.14@51.279,45.54
NetDD23_3: DD23.3 R154.1 VT77.1 X5.37 | length 24.6
  Bottom Layer w0.15: VT77.1@36.3,24.625 36.3,24.675 37.275,25.65 R154.1@37.275,26.25 37.425,26.25 37.95,26.775 37.95,28.404 36.805,29.549 36.805,30.595 37.825,31.615 37.825,32.635 X5.37@37.88,32.69 38.8,33.61 38.8,44.025 37.285,45.54 DD23.3@36.329,45.54
NetDD23_4: DD23.4 R156.1 VT78.1 X5.38 | length 25.8
  Top Layer w0.15: X5.38@37.88,30.15 37.95,30.08 37.95,26.775 37.425,26.25 R156.1@37.275,26.25 37.275,25.6 38.2,24.675 VT78.1@38.2,24.625
  Bottom Layer w0.15: DD23.4@36.329,46.81 38.065,46.81 39.375,45.5 39.375,33.834 ccw(c40.719,32.685) 39,33.1 ccw(c40.693,32.691) 38.953,32.761 cw(c37.88,32.69) 38.953,32.62 ccw(c40.693,32.691) 38.999,32.288 37.935,31.225 37.935,30.205 X5.38@37.88,30.15
NetDD23_5: DD23.5 R158.1 VT79.1 X5.39 | length 32.9
  Bottom Layer w0.15: VT79.1@33.725,21.325 33.725,21.375 34.775,22.425 R158.1@34.775,26.25 34.925,26.25 36.415,27.74 36.415,30.595 35.395,31.615 35.395,32.635 X5.39@35.34,32.69 38.2,35.55 38.2,43.958 37.363,44.795 35.515,44.795 34.975,45.335 34.975,47.015 35.494,47.534 35.494,47.855 35.719,48.08 DD23.5@36.329,48.08
NetDD23_6: DD23.6 R160.1 VT80.1 X5.40 | length 30.3
  Top Layer w0.15: X5.40@35.34,30.15 35.45,30.04 35.45,26.775 34.925,26.25 R160.1@34.775,26.25 34.775,22.225 35.625,21.375 VT80.1@35.625,21.325
  Bottom Layer w0.15: X5.40@35.34,30.15 35.285,30.205 35.285,31.225 34.475,32.035 34.475,32.052 cw(c35.34,32.69) 34.475,33.328 34.475,48.075 35.75,49.35 DD23.6@36.329,49.35
NetDD23_11: DD23.11 R146.1 VT73.1 X5.33 | length 28.6
  Bottom Layer w0.15: DD23.11@41.279,49.35 41.975,49.35 44,47.325 44,35.15 42.96,34.11 X5.33@42.96,32.69 44.035,31.615 44.035,27.21 43.075,26.25 R146.1@42.4,26.25 42.4,25.65 41.425,24.675 VT73.1@41.425,24.625
NetDD23_12: DD23.12 R148.1 VT74.1 X5.34 | length 26.7
  Top Layer w0.15: X5.34@42.96,30.15 42.96,28.453 43.075,28.338 43.075,26.775 42.55,26.25 R148.1@42.4,26.25 42.4,25.6 43.325,24.675 VT74.1@43.325,24.625
  Bottom Layer w0.15: DD23.12@41.279,48.08 41.895,48.08 43.575,46.4 43.575,35.525 41.885,33.835 41.885,32.245 42.905,31.225 42.905,30.205 X5.34@42.96,30.15
NetDD23_13: DD23.13 R150.1 VT75.1 X5.35 | length 29.5
  Bottom Layer w0.15: VT75.1@38.85,21.325 38.85,21.375 39.9,22.425 R150.1@39.9,26.25 40.05,26.25 41.495,27.695 41.495,30.595 40.475,31.615 40.475,32.635 X5.35@40.42,32.69 40.42,32.794 43.225,35.599 43.225,45.55 41.965,46.81 DD23.13@41.279,46.81
NetDD23_14: DD23.14 R152.1 VT76.1 X5.36 | length 27.8
  Top Layer w0.15: X5.36@40.42,30.15 40.42,28.298 40.575,28.143 40.575,26.775 40.05,26.25 R152.1@39.9,26.25 39.9,22.225 40.75,21.375 VT76.1@40.75,21.325
  Bottom Layer w0.15: X5.36@40.42,30.15 40.365,30.205 40.365,31.225 39.661,31.929 cw(c40.42,32.69) 39.653,33.443 42.875,36.725 42.875,44.55 41.885,45.54 DD23.14@41.279,45.54
NetDD24_3: DD24.3 R170.1 VT85.1 X6.5 | length 24.4
  Bottom Layer w0.15: DD24.3@25.729,45.54 26.76,45.54 28.075,44.225 28.075,33.563 28.067,33.554 28.067,32.997 27.77,32.7 27.715,32.645 27.715,31.549 27.656,31.49 ccw(c30.845,26.405) 26.65,30.697 ccw(c26.755,30.591) 26.605,30.592 26.605,29.574 27.7,28.479 27.7,26.775 27.175,26.25 R170.1@27.025,26.25 27.025,25.65 26.05,24.675 VT85.1@26.05,24.625
NetDD24_4: DD24.4 R172.1 VT86.1 X6.6 | length 25.2
  Top Layer w0.15: X6.6@27.77,30.16 27.77,26.845 27.175,26.25 R172.1@27.025,26.25 27.025,25.6 27.95,24.675 VT86.1@27.95,24.625
  Bottom Layer w0.15: DD24.4@25.729,46.81 26.54,46.81 28.95,44.4 28.95,34.385 ccw(c36.571,31.954) 28.67,33.203 cw(c27.72,32.7) 28.623,32.117 cw(c27.583,32.388) 28.583,31.992 27.825,31.235 27.825,30.215 X6.6@27.77,30.16
NetDD24_5: DD24.5 R174.1 VT87.1 X6.7 | length 32.4
  Bottom Layer w0.15: VT87.1@23.475,21.325 23.475,21.375 24.4,22.3 R174.1@24.4,26.125 24.55,26.125 26.305,27.88 26.305,30.605 25.285,31.625 25.285,32.645 25.23,32.7 27.225,34.695 27.225,44.333 26.763,44.795 24.915,44.795 24.519,45.191 24.519,47.555 25.044,48.08 DD24.5@25.729,48.08
NetDD24_6: DD24.6 R176.1 VT88.1 X6.8 | length 30.5
  Top Layer w0.15: X6.8@25.23,30.16 25.23,26.805 24.55,26.125 R176.1@24.4,26.125 24.4,22.35 25.375,21.375 VT88.1@25.375,21.325
  Bottom Layer w0.15: X6.8@25.23,30.16 25.053,30.337 25.053,31.147 24,32.2 24,48.275 25.075,49.35 DD24.6@25.729,49.35
NetDD24_11: DD24.11 R162.1 VT81.1 X6.1 | length 28.8
  Bottom Layer w0.15: DD24.11@30.679,49.35 31.4,49.35 34.125,46.625 34.125,34.935 32.965,33.775 32.965,32.815 32.85,32.7 32.905,32.645 32.905,31.625 33.925,30.605 33.925,27.875 32.3,26.25 R162.1@32.15,26.25 32.15,25.65 31.175,24.675 VT81.1@31.175,24.625
NetDD24_12: DD24.12 R164.1 VT82.1 X6.2 | length 27.3
  Top Layer w0.15: X6.2@32.85,30.16 32.85,26.8 32.3,26.25 R164.1@32.15,26.25 32.15,25.6 33.075,24.675 VT82.1@33.075,24.625
  Bottom Layer w0.15: DD24.12@30.679,48.08 31.42,48.08 33.665,45.835 33.665,35.525 31.55,33.41 31.55,32.35 32.753,31.147 32.753,30.257 X6.2@32.85,30.16
NetDD24_13: DD24.13 R166.1 VT83.1 X6.3 | length 30.2
  Bottom Layer w0.15: VT83.1@28.6,21.325 28.6,21.375 29.525,22.3 R166.1@29.525,26.25 30.175,26.25 31.385,27.46 31.385,30.605 30.365,31.625 30.365,32.645 30.31,32.7 33.365,35.755 33.365,44.76 31.315,46.81 DD24.13@30.679,46.81
NetDD24_14: DD24.14 R168.1 VT84.1 X6.4 | length 28.3
  Top Layer w0.15: X6.4@30.31,30.16 30.31,26.885 29.675,26.25 R168.1@29.525,26.25 29.525,22.35 30.5,21.375 VT84.1@30.5,21.325
  Bottom Layer w0.15: X6.4@30.31,30.16 30.255,30.215 30.255,30.895 29.185,31.965 29.185,32.7 cw(c30.26,32.7) 29.497,33.457 32.925,36.91 32.925,43.925 31.31,45.54 DD24.14@30.679,45.54
NetDD25_3: DD25.3 R186.1 VT93.1 X6.13 | length 24.5
  Bottom Layer w0.15: VT93.1@15.8,24.5 15.8,24.55 16.775,25.525 R186.1@16.775,26.125 16.775,26.65 16.484,26.941 16.391,26.941 16.1,27.232 16.1,28.133 16.445,28.478 16.445,30.82 17.338,31.713 17.338,32.428 17.61,32.7 17.61,33.119 18.65,34.159 18.65,43.65 16.76,45.54 DD25.3@15.829,45.54
NetDD25_4: DD25.4 R188.1 VT94.1 X6.14 | length 25.7
  Top Layer w0.15: X6.14@17.61,30.16 17.61,26.81 16.925,26.125 R188.1@16.775,26.125 16.775,25.475 17.7,24.55 VT94.1@17.7,24.5
  Bottom Layer w0.15: DD25.4@15.829,46.81 16.59,46.81 19.075,44.325 19.075,33.89 ccw(c20.846,32.307) 18.583,33.03 cw(c17.56,32.7) 18.598,32.42 cw(c17.56,32.7) 18.485,32.152 ccw(c19.822,32.472) 18.875,31.475 X6.14@17.56,30.16
NetDD25_5: DD25.5 R190.1 VT95.1 X6.15 | length 33.1
  Bottom Layer w0.15: VT95.1@13.225,21.2 13.225,21.25 14.1,22.125 R190.1@14.1,26.125 14.25,26.125 14.475,26.35 14.475,26.932 16.145,28.602 16.145,30.605 15.125,31.625 15.125,32.645 15.07,32.7 15.075,32.7 17.85,35.475 17.85,43.808 16.863,44.795 15.015,44.795 14.525,45.285 14.525,47.386 14.994,47.855 15.219,48.08 DD25.5@15.829,48.08
NetDD25_6: DD25.6 R192.1 VT96.1 X6.16 | length 30.8
  Top Layer w0.15: X6.16@15.07,30.16 15.07,26.945 14.25,26.125 R192.1@14.1,26.125 14.1,22.275 15.125,21.25 VT96.1@15.125,21.2
  Bottom Layer w0.15: X6.16@15.07,30.16 14.878,30.352 14.878,31.147 13.875,32.15 13.875,48.075 15.15,49.35 DD25.6@15.829,49.35
NetDD25_11: DD25.11 R178.1 VT89.1 X6.9 | length 28.6
  Bottom Layer w0.15: DD25.11@20.779,49.35 21.575,49.35 23.625,47.3 23.625,34.925 22.69,33.99 22.69,32.7 22.745,32.645 22.745,31.625 23.765,30.605 23.765,28.422 22.275,26.932 22.275,26.35 22.05,26.125 R178.1@21.9,26.125 21.9,25.525 20.925,24.55 VT89.1@20.925,24.5
NetDD25_12: DD25.12 R180.1 VT90.1 X6.10 | length 27.1
  Top Layer w0.15: X6.10@22.69,30.16 22.69,26.765 22.05,26.125 R180.1@21.9,26.125 21.9,25.475 22.825,24.55 VT90.1@22.825,24.5
  Bottom Layer w0.15: DD25.12@20.779,48.08 21.42,48.08 23.275,46.225 23.275,35.325 21.45,33.5 21.45,32.025 22.635,30.84 22.635,30.215 X6.10@22.69,30.16
NetDD25_13: DD25.13 R182.1 VT91.1 X6.11 | length 30.1
  Bottom Layer w0.15: VT91.1@18.35,21.2 18.35,21.25 19.4,22.3 R182.1@19.4,26.125 20.075,26.125 20.275,26.325 20.275,28.15 21.225,29.1 21.225,30.605 20.205,31.625 20.205,32.645 20.15,32.7 20.15,33 22.9,35.75 22.9,45.375 21.465,46.81 DD25.13@20.779,46.81
NetDD25_14: DD25.14 R184.1 VT92.1 X6.12 | length 27.8
  Top Layer w0.15: X6.12@20.15,30.16 20.15,26.725 19.55,26.125 R184.1@19.4,26.125 19.4,22.1 20.25,21.25 VT92.1@20.25,21.2
  Bottom Layer w0.15: 19.387,33.505 19.385,33.503 19.369,33.488 ccw(c20.1,32.7) 19.362,31.918 19.364,31.917 19.365,31.916 19.453,31.827 20.095,30.905 20.095,30.215 X6.12@20.15,30.16 ; 19.387,33.506 19.475,33.593 22.45,36.9 22.45,44.5 21.41,45.54 DD25.14@20.779,45.54
NetR1_1: R1.1 VD1.A | length 3.5
  Top Layer w0.15: VD1.A@135.575,12.8 137.925,10.45 138.025,10.45 R1.1@138.1,10.375
NetR3_1: R3.1 VD2.A | length 3.5
  Top Layer w0.15: VD2.A@134.2,12.8 136.55,10.45 136.625,10.45 R3.1@136.7,10.375
NetR5_1: R5.1 VD3.A | length 3.5
  Top Layer w0.15: VD3.A@132.825,12.8 135.175,10.45 135.225,10.45 R5.1@135.3,10.375
NetR7_1: R7.1 VD4.A | length 3.4
  Top Layer w0.15: VD4.A@131.45,12.8 131.525,12.725 131.525,12.7 R7.1@133.85,10.375
NetR9_1: R9.1 VD5.A | length 3.4
  Top Layer w0.15: VD5.A@130.075,12.8 130.15,12.725 130.15,12.675 R9.1@132.45,10.375
NetR11_1: R11.1 VD6.A | length 3.4
  Top Layer w0.15: VD6.A@128.675,12.8 128.75,12.725 128.75,12.6 R11.1@130.975,10.375
NetR13_1: R13.1 VD7.A | length 3.3
  Top Layer w0.15: VD7.A@127.3,12.8 127.375,12.725 127.375,12.5 R13.1@129.5,10.375
NetR15_1: R15.1 VD8.A | length 3.3
  Top Layer w0.15: VD8.A@125.925,12.8 126,12.725 126,12.45 R15.1@128.075,10.375
NetR17_1: R17.1 VD9.A | length 3.3
  Top Layer w0.15: VD9.A@124.55,12.8 124.625,12.725 124.625,12.375 R17.1@126.625,10.375
NetR19_1: R19.1 VD10.A | length 3.3
  Top Layer w0.15: VD10.A@123.175,12.8 123.25,12.725 123.25,12.325 R19.1@125.2,10.375
NetR21_1: R21.1 VD11.A | length 3.2
  Top Layer w0.15: VD11.A@121.8,12.8 121.875,12.725 121.875,12.25 R21.1@123.75,10.375
NetR23_1: R23.1 VD12.A | length 3.2
  Top Layer w0.15: VD12.A@120.425,12.8 120.5,12.725 120.5,12.2 R23.1@122.325,10.375
NetR25_1: R25.1 VD13.A | length 3.2
  Top Layer w0.15: VD13.A@119.05,12.8 119.125,12.725 119.125,12.125 R25.1@120.875,10.375
NetR27_1: R27.1 VD14.A | length 3.1
  Top Layer w0.15: VD14.A@117.675,12.8 117.75,12.725 117.75,12.05 R27.1@119.425,10.375
NetR29_1: R29.1 VD15.A | length 3.1
  Top Layer w0.15: VD15.A@116.3,12.8 116.375,12.725 116.375,11.975 R29.1@117.975,10.375
NetR31_1: R31.1 VD16.A | length 3.1
  Top Layer w0.15: VD16.A@114.9,12.8 114.975,12.725 114.975,11.925 R31.1@116.525,10.375
NetR33_1: R33.1 VD17.A | length 3.1
  Top Layer w0.15: VD17.A@113.55,12.8 113.625,12.725 113.625,11.85 R33.1@115.1,10.375
NetR35_1: R35.1 VD18.A | length 3.1
  Top Layer w0.15: VD18.A@112.15,12.8 112.225,12.725 112.225,11.825 R35.1@113.675,10.375
NetR37_1: R37.1 VD19.A | length 3
  Top Layer w0.15: VD19.A@110.8,12.8 112.175,11.425 112.175,10.45 R37.1@112.25,10.375
NetR39_1: R39.1 VD20.A | length 3
  Top Layer w0.15: VD20.A@109.425,12.8 110.75,11.475 110.75,10.45 R39.1@110.825,10.375
NetR41_1: R41.1 VD21.A | length 3
  Top Layer w0.15: VD21.A@108.05,12.8 109.3,11.55 109.3,10.45 R41.1@109.375,10.375
NetR43_1: R43.1 VD22.A | length 2.9
  Top Layer w0.15: VD22.A@106.675,12.8 107.825,11.65 107.825,10.45 R43.1@107.9,10.375
NetR45_1: R45.1 VD23.A | length 2.9
  Top Layer w0.15: VD23.A@105.3,12.8 106.375,11.725 106.375,10.45 R45.1@106.45,10.375
NetR47_1: R47.1 VD24.A | length 2.8
  Top Layer w0.15: VD24.A@104.025,12.8 104.025,12.375 105,11.4 R47.1@105,10.375
NetR49_1: R49.1 VD25.A | length 2.8
  Top Layer w0.15: VD25.A@102.725,12.8 102.725,12.375 103.525,11.575 R49.1@103.525,10.375
NetR51_1: R51.1 VD26.A | length 2.7
  Top Layer w0.15: VD26.A@101.4,12.8 101.4,12.375 102.05,11.725 R51.1@102.05,10.375
NetR53_1: R53.1 VD27.A | length 2.6
  Top Layer w0.15: VD27.A@100.125,12.8 100.125,12.375 100.625,11.875 R53.1@100.625,10.375
NetR55_1: R55.1 VD28.A | length 2.5
  Top Layer w0.15: VD28.A@98.85,12.8 98.85,12.375 99.15,12.075 R55.1@99.15,10.375
NetR57_1: R57.1 VD29.A | length 2.5
  Top Layer w0.15: VD29.A@97.45,12.8 97.45,12.375 97.675,12.15 R57.1@97.675,10.375
NetR59_1: R59.1 VD30.A | length 2.5
  Top Layer w0.15: VD30.A@96.075,12.8 96.075,12.375 96.25,12.2 R59.1@96.25,10.375
NetR61_1: R61.1 VD31.A | length 2.5
  Top Layer w0.15: VD31.A@94.7,12.8 94.7,12.375 94.8,12.275 R61.1@94.8,10.375
NetR63_1: R63.1 VD32.A | length 2.4
  Top Layer w0.15: R63.1@93.325,10.375 93.325,10.75 VD32.A@93.325,12.8
NetR65_1: R65.1 VD33.A | length 2.4
  Top Layer w0.15: R65.1@91.9,10.375 91.9,10.75 91.95,10.8 VD33.A@91.95,12.8
NetR67_1: R67.1 VD34.A | length 2.5
  Top Layer w0.15: R67.1@90.425,10.375 90.425,10.75 90.575,10.9 VD34.A@90.575,12.8
NetR69_1: R69.1 VD35.A | length 2.5
  Top Layer w0.15: R69.1@88.95,10.375 88.95,10.75 89.225,11.025 VD35.A@89.225,12.8
NetR71_1: R71.1 VD36.A | length 2.6
  Top Layer w0.15: R71.1@87.525,10.375 87.525,10.75 87.975,11.2 VD36.A@87.975,12.8
NetR73_1: R73.1 VD37.A | length 2.6
  Top Layer w0.15: R73.1@86.075,10.375 86.075,10.75 86.6,11.275 VD37.A@86.6,12.8
NetR75_1: R75.1 VD38.A | length 2.7
  Top Layer w0.15: R75.1@84.675,10.375 84.675,10.75 85.225,11.3 VD38.A@85.225,12.8
NetR77_1: R77.1 VD39.A | length 2.7
  Top Layer w0.15: R77.1@83.275,10.375 83.275,11.8 83.85,12.375 VD39.A@83.85,12.8
NetR79_1: R79.1 VD40.A | length 2.7
  Top Layer w0.15: R79.1@81.825,10.375 81.825,11.7 82.475,12.35 VD40.A@82.475,12.775
NetR81_1: R81.1 VD41.A | length 2.7
  Top Layer w0.15: R81.1@80.425,10.375 80.425,11.7 81.1,12.375 VD41.A@81.1,12.8
NetR83_1: R83.1 VD42.A | length 2.7
  Top Layer w0.15: R83.1@79,10.375 79,11.65 79.725,12.375 VD42.A@79.725,12.8
NetR85_1: R85.1 VD43.A | length 2.7
  Top Layer w0.15: R85.1@77.575,10.375 77.575,11.6 78.35,12.375 VD43.A@78.35,12.8
NetR87_1: R87.1 VD44.A | length 2.8
  Top Layer w0.15: R87.1@76.15,10.375 76.15,11.55 76.975,12.375 VD44.A@76.975,12.8
NetR89_1: R89.1 VD45.A | length 2.8
  Top Layer w0.15: R89.1@74.7,10.375 74.7,11.475 75.6,12.375 VD45.A@75.6,12.8
NetR91_1: R91.1 VD46.A | length 2.8
  Top Layer w0.15: R91.1@73.25,10.375 73.25,11.4 74.225,12.375 VD46.A@74.225,12.8
NetR93_1: R93.1 VD47.A | length 2.8
  Top Layer w0.15: R93.1@71.825,10.375 71.9,10.45 71.9,11.85 VD47.A@72.85,12.8
NetR95_1: R95.1 VD48.A | length 2.9
  Top Layer w0.15: R95.1@70.425,10.375 70.5,10.45 70.5,11.825 VD48.A@71.475,12.8
NetR97_1: R97.1 VD49.A | length 2.9
  Top Layer w0.15: R97.1@69,10.375 69.075,10.45 69.075,11.775 VD49.A@70.1,12.8
NetR99_1: R99.1 VD50.A | length 2.9
  Top Layer w0.15: R99.1@67.575,10.375 67.65,10.45 67.65,11.725 VD50.A@68.725,12.8
NetR101_1: R101.1 VD51.A | length 2.9
  Top Layer w0.15: R101.1@66.15,10.375 66.225,10.45 66.225,11.675 VD51.A@67.35,12.8
NetR103_1: R103.1 VD52.A | length 3
  Top Layer w0.15: R103.1@64.7,10.375 64.775,10.45 64.775,11.6 VD52.A@65.975,12.8
NetR105_1: R105.1 VD53.A | length 3
  Top Layer w0.15: R105.1@63.25,10.375 63.325,10.45 63.325,11.525 VD53.A@64.6,12.8
NetR107_1: R107.1 VD54.A | length 3
  Top Layer w0.15: R107.1@61.825,10.375 61.9,10.45 61.9,11.475 VD54.A@63.225,12.8
NetR109_1: R109.1 VD55.A | length 3
  Top Layer w0.15: R109.1@60.4,10.375 60.475,10.45 60.475,11.425 VD55.A@61.85,12.8
NetR111_1: R111.1 VD56.A | length 3.1
  Top Layer w0.15: R111.1@58.95,10.375 59.025,10.45 59.025,11.35 VD56.A@60.475,12.8
NetR113_1: R113.1 VD57.A | length 3.1
  Top Layer w0.15: R113.1@57.525,10.375 57.6,10.45 57.6,11.3 VD57.A@59.1,12.8
NetR115_1: R115.1 VD58.A | length 3.1
  Top Layer w0.15: R115.1@56.075,10.375 57.65,11.95 57.65,12.725 VD58.A@57.725,12.8
NetR117_1: R117.1 VD59.A | length 3.1
  Top Layer w0.15: R117.1@54.625,10.375 56.275,12.025 56.275,12.725 VD59.A@56.35,12.8
NetR119_1: R119.1 VD60.A | length 3.2
  Top Layer w0.15: R119.1@53.2,10.375 54.9,12.075 54.9,12.725 VD60.A@54.975,12.8
NetR121_1: R121.1 VD61.A | length 3.2
  Top Layer w0.15: R121.1@51.75,10.375 53.525,12.15 53.525,12.725 VD61.A@53.6,12.8
NetR123_1: R123.1 VD62.A | length 3.2
  Top Layer w0.15: R123.1@50.325,10.375 52.15,12.2 52.15,12.725 VD62.A@52.225,12.8
NetR125_1: R125.1 VD63.A | length 3.2
  Top Layer w0.15: R125.1@48.9,10.375 50.775,12.25 50.775,12.725 VD63.A@50.85,12.8
NetR127_1: R127.1 VD64.A | length 3.3
  Top Layer w0.15: R127.1@47.45,10.375 49.4,12.325 49.4,12.725 VD64.A@49.475,12.8
NetR129_1: R129.1 VD65.A | length 3.3
  Top Layer w0.15: R129.1@46.025,10.375 48.025,12.375 48.025,12.7 VD65.A@48.1,12.775
NetR131_1: R131.1 VD66.A | length 3.3
  Top Layer w0.15: R131.1@44.575,10.375 46.65,12.45 46.65,12.725 VD66.A@46.725,12.8
NetR133_1: R133.1 VD67.A | length 3.3
  Top Layer w0.15: R133.1@43.125,10.375 45.275,12.525 45.275,12.725 VD67.A@45.35,12.8
NetR135_1: R135.1 VD68.A | length 3.4
  Top Layer w0.15: R135.1@41.7,10.375 43.9,12.575 43.9,12.725 VD68.A@43.975,12.8
NetR137_1: R137.1 VD69.A | length 3.4
  Top Layer w0.15: R137.1@40.25,10.375 42.525,12.65 42.525,12.725 VD69.A@42.6,12.8
NetR139_1: R139.1 VD70.A | length 3.4
  Top Layer w0.15: R139.1@38.825,10.375 41.15,12.7 41.15,12.725 VD70.A@41.225,12.8
NetR141_1: R141.1 VD71.A | length 3.4
  Top Layer w0.15: R141.1@37.425,10.375 39.775,12.725 VD71.A@39.85,12.8
NetR143_1: R143.1 VD72.A | length 3.5
  Top Layer w0.15: R143.1@36,10.375 36.075,10.45 36.125,10.45 VD72.A@38.475,12.8
NetR145_1: R145.1 VD73.A | length 3.5
  Top Layer w0.15: R145.1@34.575,10.375 34.65,10.45 34.75,10.45 VD73.A@37.1,12.8
NetR147_1: R147.1 VD74.A | length 3.6
  Top Layer w0.15: R147.1@33.175,10.375 35.525,12.725 35.65,12.725 VD74.A@35.725,12.8
NetR149_1: R149.1 VD75.A | length 3.6
  Top Layer w0.15: R149.1@31.75,10.375 34.1,12.725 34.275,12.725 VD75.A@34.35,12.8
NetR151_1: R151.1 VD76.A | length 3.7
  Top Layer w0.15: R151.1@30.325,10.375 32.675,12.725 32.9,12.725 VD76.A@32.975,12.8
NetR153_1: R153.1 VD77.A | length 3.7
  Top Layer w0.15: R153.1@28.875,10.375 31.225,12.725 31.525,12.725 VD77.A@31.6,12.8
NetR155_1: R155.1 VD78.A | length 3.8
  Top Layer w0.15: R155.1@27.45,10.375 27.6,10.375 29.75,12.525 29.95,12.525 VD78.A@30.225,12.8
NetR157_1: R157.1 VD79.A | length 3.8
  Top Layer w0.15: R157.1@26.025,10.375 26.175,10.375 28.325,12.525 28.575,12.525 VD79.A@28.85,12.8
NetR159_1: R159.1 VD80.A | length 4.2
  Top Layer w0.15: R159.1@24.575,10.375 24.725,10.375 25.763,11.413 26.663,11.413 27.475,12.225 VD80.A@27.475,12.8
NetR161_1: R161.1 VD81.A | length 3.9
  Top Layer w0.15: R161.1@23.175,10.375 23.325,10.375 25.475,12.525 25.825,12.525 VD81.A@26.1,12.8
NetR163_1: R163.1 VD82.A | length 4
  Top Layer w0.15: R163.1@21.75,10.375 21.9,10.375 23.088,11.563 23.488,11.563 VD82.A@24.725,12.8
NetR165_1: R165.1 VD83.A | length 4
  Top Layer w0.15: R165.1@20.325,10.375 20.475,10.375 21.663,11.563 22.113,11.563 VD83.A@23.35,12.8
NetR167_1: R167.1 VD84.A | length 4.1
  Top Layer w0.15: R167.1@18.875,10.375 19.025,10.375 20.213,11.563 20.737,11.563 VD84.A@21.975,12.8
NetR169_1: R169.1 VD85.A | length 4.2
  Top Layer w0.15: R169.1@17.45,10.375 17.6,10.375 18.788,11.563 19.363,11.563 VD85.A@20.6,12.8
NetR171_1: R171.1 VD86.A | length 4.2
  Top Layer w0.15: R171.1@16.025,10.375 16.175,10.375 17.363,11.563 17.988,11.563 VD86.A@19.225,12.8
NetR173_1: R173.1 VD87.A | length 4.2
  Top Layer w0.15: R173.1@14.625,10.375 14.775,10.375 15.963,11.563 16.613,11.563 VD87.A@17.85,12.8
NetR175_1: R175.1 VD88.A | length 4.3
  Top Layer w0.15: R175.1@13.2,10.375 13.35,10.375 14.538,11.563 15.238,11.563 VD88.A@16.475,12.8
NetR177_1: R177.1 VD89.A | length 4.3
  Top Layer w0.15: R177.1@11.775,10.375 11.925,10.375 13.113,11.563 13.862,11.563 VD89.A@15.1,12.8
NetR179_1: R179.1 VD90.A | length 4.4
  Top Layer w0.15: R179.1@10.325,10.375 10.475,10.375 11.663,11.563 12.488,11.563 VD90.A@13.725,12.8
NetR181_1: R181.1 VD91.A | length 4.5
  Top Layer w0.15: R181.1@8.875,10.375 9.025,10.375 10.213,11.563 11.112,11.563 VD91.A@12.35,12.8
NetR183_1: R183.1 VD92.A | length 4.5
  Top Layer w0.15: R183.1@7.45,10.375 7.6,10.375 8.788,11.563 9.738,11.563 VD92.A@10.975,12.8
NetR185_1: R185.1 VD93.A | length 4.6
  Top Layer w0.15: R185.1@6.025,10.375 6.175,10.375 7.363,11.563 8.363,11.563 VD93.A@9.6,12.8
NetR187_1: R187.1 VD94.A | length 4.7
  Top Layer w0.15: R187.1@4.575,10.375 4.8,10.6 5.1,10.6 6,11.5 6.876,11.5 7.238,11.863 7.288,11.863 VD94.A@8.225,12.8
NetR189_1: R189.1 VD95.A | length 4.7
  Top Layer w0.15: R189.1@3.15,10.375 3.3,10.375 4.488,11.563 5.613,11.563 VD95.A@6.85,12.8
NetR191_1: R191.1 VD96.A | length 4.8
  Top Layer w0.15: R191.1@1.7,10.375 1.85,10.375 4.275,12.8 VD96.A@5.475,12.8
NetR217_2: R217.2 X1.1 | length 6.5
  Top Layer w0.15: X1.1@134.333,65.75 138.908,70.325 R217.2@138.95,70.325
NetR218_2: R218.2 X1.2 | length 9.3
  Top Layer w0.15: X1.2@134.345,63.21 133.2,64.355 133.2,66 133.326,66.126 cw(c134.333,65.75) 133.573,66.51 cw(c133.918,66.165) 133.574,66.511 cw(c134.333,65.75) 133.819,66.694 R218.2@137.45,70.325
NetR219_2: R219.2 X1.3 | length 6.5
  Top Layer w0.15: X1.3@131.793,65.75 135.975,69.932 135.975,70.325 R219.2@136.125,70.325
NetR220_2: R220.2 X1.4 | length 9.3
  Top Layer w0.15: X1.4@131.805,63.21 130.6,64.415 130.6,66.275 R220.2@134.65,70.325
NetR221_2: R221.2 X1.5 | length 6.3
  Top Layer w0.15: X1.5@129.265,65.75 129.525,66.01 129.525,66.825 133.025,70.325 R221.2@133.175,70.325
NetR222_2: R222.2 X1.6 | length 9.2
  Top Layer w0.15: X1.6@129.265,63.21 128.05,64.425 128.05,66.8 131.575,70.325 R222.2@131.725,70.325
NetR223_2: R223.2 X1.7 | length 6.1
  Top Layer w0.15: X1.7@126.725,65.75 126.725,66.925 130.125,70.325 R223.2@130.275,70.325